# Altium PCB PY32E407Vx_START_ETH.PcbDoc (part 2 of 4)
Units mil, origin at the board's own origin, x right, y up, seen from the top; angles counter-clockwise.
Board outline 5249.65 x 2929.38 mil, 4 copper layers (Top Layer, GND, POWER, Bottom Layer); 253 components, 243 nets, 969 pads, 637 vias.
Unrouted connection lines stored in the file: 88.
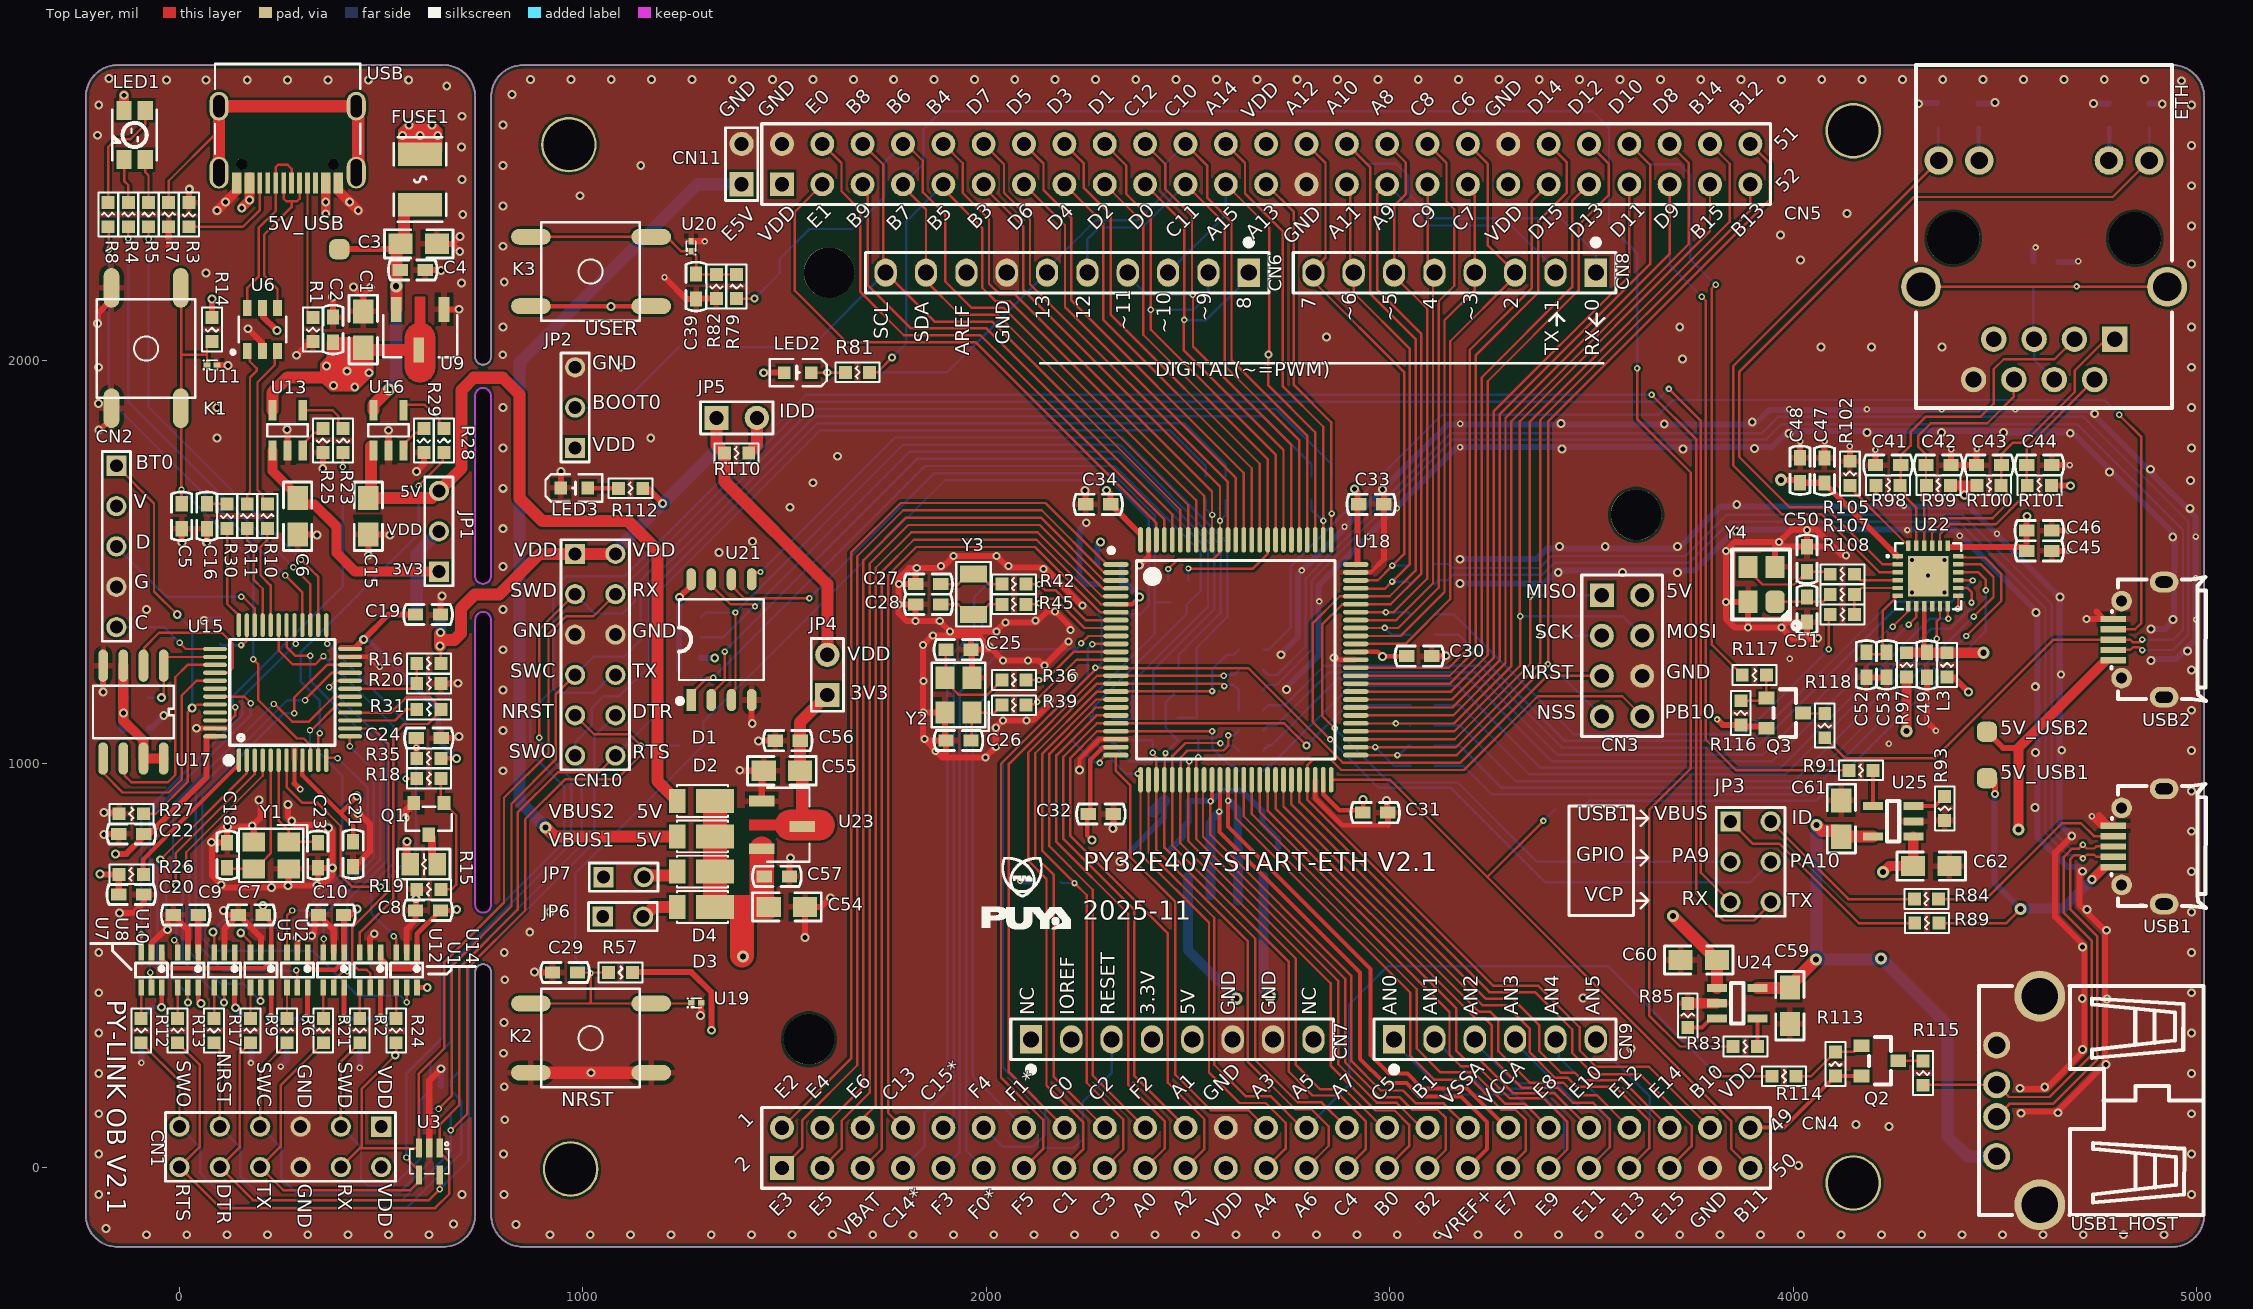
[diagram p0: Top Layer view]

## Via types
v1: diameter 22, hole 12, Top Layer to Bottom Layer, tented both sides, 393 vias
v2: diameter 16, hole 8, Top Layer to Bottom Layer, tented both sides, 115 vias
v3: diameter 20, hole 10, Top Layer to Bottom Layer, tented both sides, 54 vias
v4: diameter 16, hole 9, Top Layer to Bottom Layer, tented both sides, 41 vias
v5: diameter 30, hole 15, Top Layer to Bottom Layer, tented both sides, 16 vias
v6: diameter 20, hole 10, Top Layer to Bottom Layer, 9 vias
v7: diameter 15, hole 8, Top Layer to Bottom Layer, tented both sides, 5 vias
v8: diameter 16, hole 8, Top Layer to Bottom Layer, 3 vias
v9: diameter 20, hole 12, Top Layer to Bottom Layer, tented both sides, 1 vias

## Nets (pads, with @x,y where several pads share a name; then routed paths per layer and width w, separated by ;. In a path a pad name is that pad's centre, name@x,y a point inside that pad or via, vN(x,y) a via of type N, cw(c..) or ccw(c..) an arc to the next point about the centre after c; other vN are vias at no path point) (continued)
ESMC_IO3: (continued)
  Bottom Layer w6: R49.1@1292.5,1312.5 1346.83,1312.5 1423.81,1389.48 v2(1426.28,1389.48) 1809.46,1772.66 2326.91,1772.66 2564.17,1535.4 2564.17,1381.95 2413.8,1231.58 R56.1@2413.8,1109.9
ETH_VDD: C40.2 C49.2 ETH.4 ETH.5 L3.2 R97.2 U22.9 | length 552.8
  Top Layer w6: R97.2@4280.5,1274.59 R97.2@4281.5,1275.59 ; C49.2@4330.5,1275.59 C49.2@4331.5,1274.59 ; v5(4471.1,1274.59) v5@4474.1,1277.59
  Top Layer w11: C49.2@4323.66,1284.25 U22.9@4323.66,1389.49
  Top Layer w25: R97.2@4281.5,1275.59 C49.2@4330.5,1275.59 ; C49.2@4331.5,1274.59 L3.2@4380.5,1274.59 v5(4471.1,1274.59)
  Bottom Layer w6: C40.2@4594.5,2182.09 4594.5,2053.33 ETH.5@4596.19,2051.64 4596.19,2001.64 ETH.4@4646.19,1951.64
ETH_VDDA: C45.2 C46.2 C47.2 C48.2 L3.1 R98.2 R99.2 R100.2 R101.2 U22.1 U22.19 | length 881.2
  Top Layer w15: v5(3969.15,1703.22) 4008.87,1703.22 C48.2@4016.2,1695.89 4076,1695.89 C47.2@4076.7,1695.19 4239.14,1532.75 4239.45,1532.75 U22.1@4258.4,1513.8 ; R98.2@4204.4,1689.59 4204.4,1662.2 v9(4204.46,1662.15) ; L3.1@4380.5,1214.59 4396.3,1214.59 v1(4433.3,1177.59) ; U22.19@4386.25,1536.16 4568.94,1536.16 C45.2@4578,1527.09 4578,1532.82 C46.2@4578,1577.09 4578,1612.39 v1(4578.4,1612.79) ; v1@4423.8,1665.92 v1(4424.02,1665.69) ; R101.2@4639.4,1689.59 4685.2,1689.59 v1(4686.4,1688.39)
  Top Layer w25: R99.2@4389.4,1689.59 4423.8,1689.59 ; v1@4423.8,1665.92 4423.8,1689.59 ; R100.2@4454.4,1689.59 4423.8,1689.59

## Text inside footprints (layer, text, board x,y; h text height)
U11: Mechanical 14 "K" at 57.86,1982.09 h17.72
U19: Mechanical 14 "K" at 1257.86,401.19 h17.72
U20: Mechanical 14 "K" at 1273.91,2259.46 h17.72 r90